# Altium PCB WGI_BOARD.PcbDoc (part 2 of 3)
Units mm, origin at the board's own origin, x right, y up, seen from the top; angles counter-clockwise.
Board outline 79.5 x 49.7 mm, 4 copper layers (Top Layer, Layer 1, Layer 2, Bottom Layer), stack 1.454 mm thick; 210 components, 179 nets, 665 pads, 228 vias.
Unrouted connection lines stored in the file: 133.
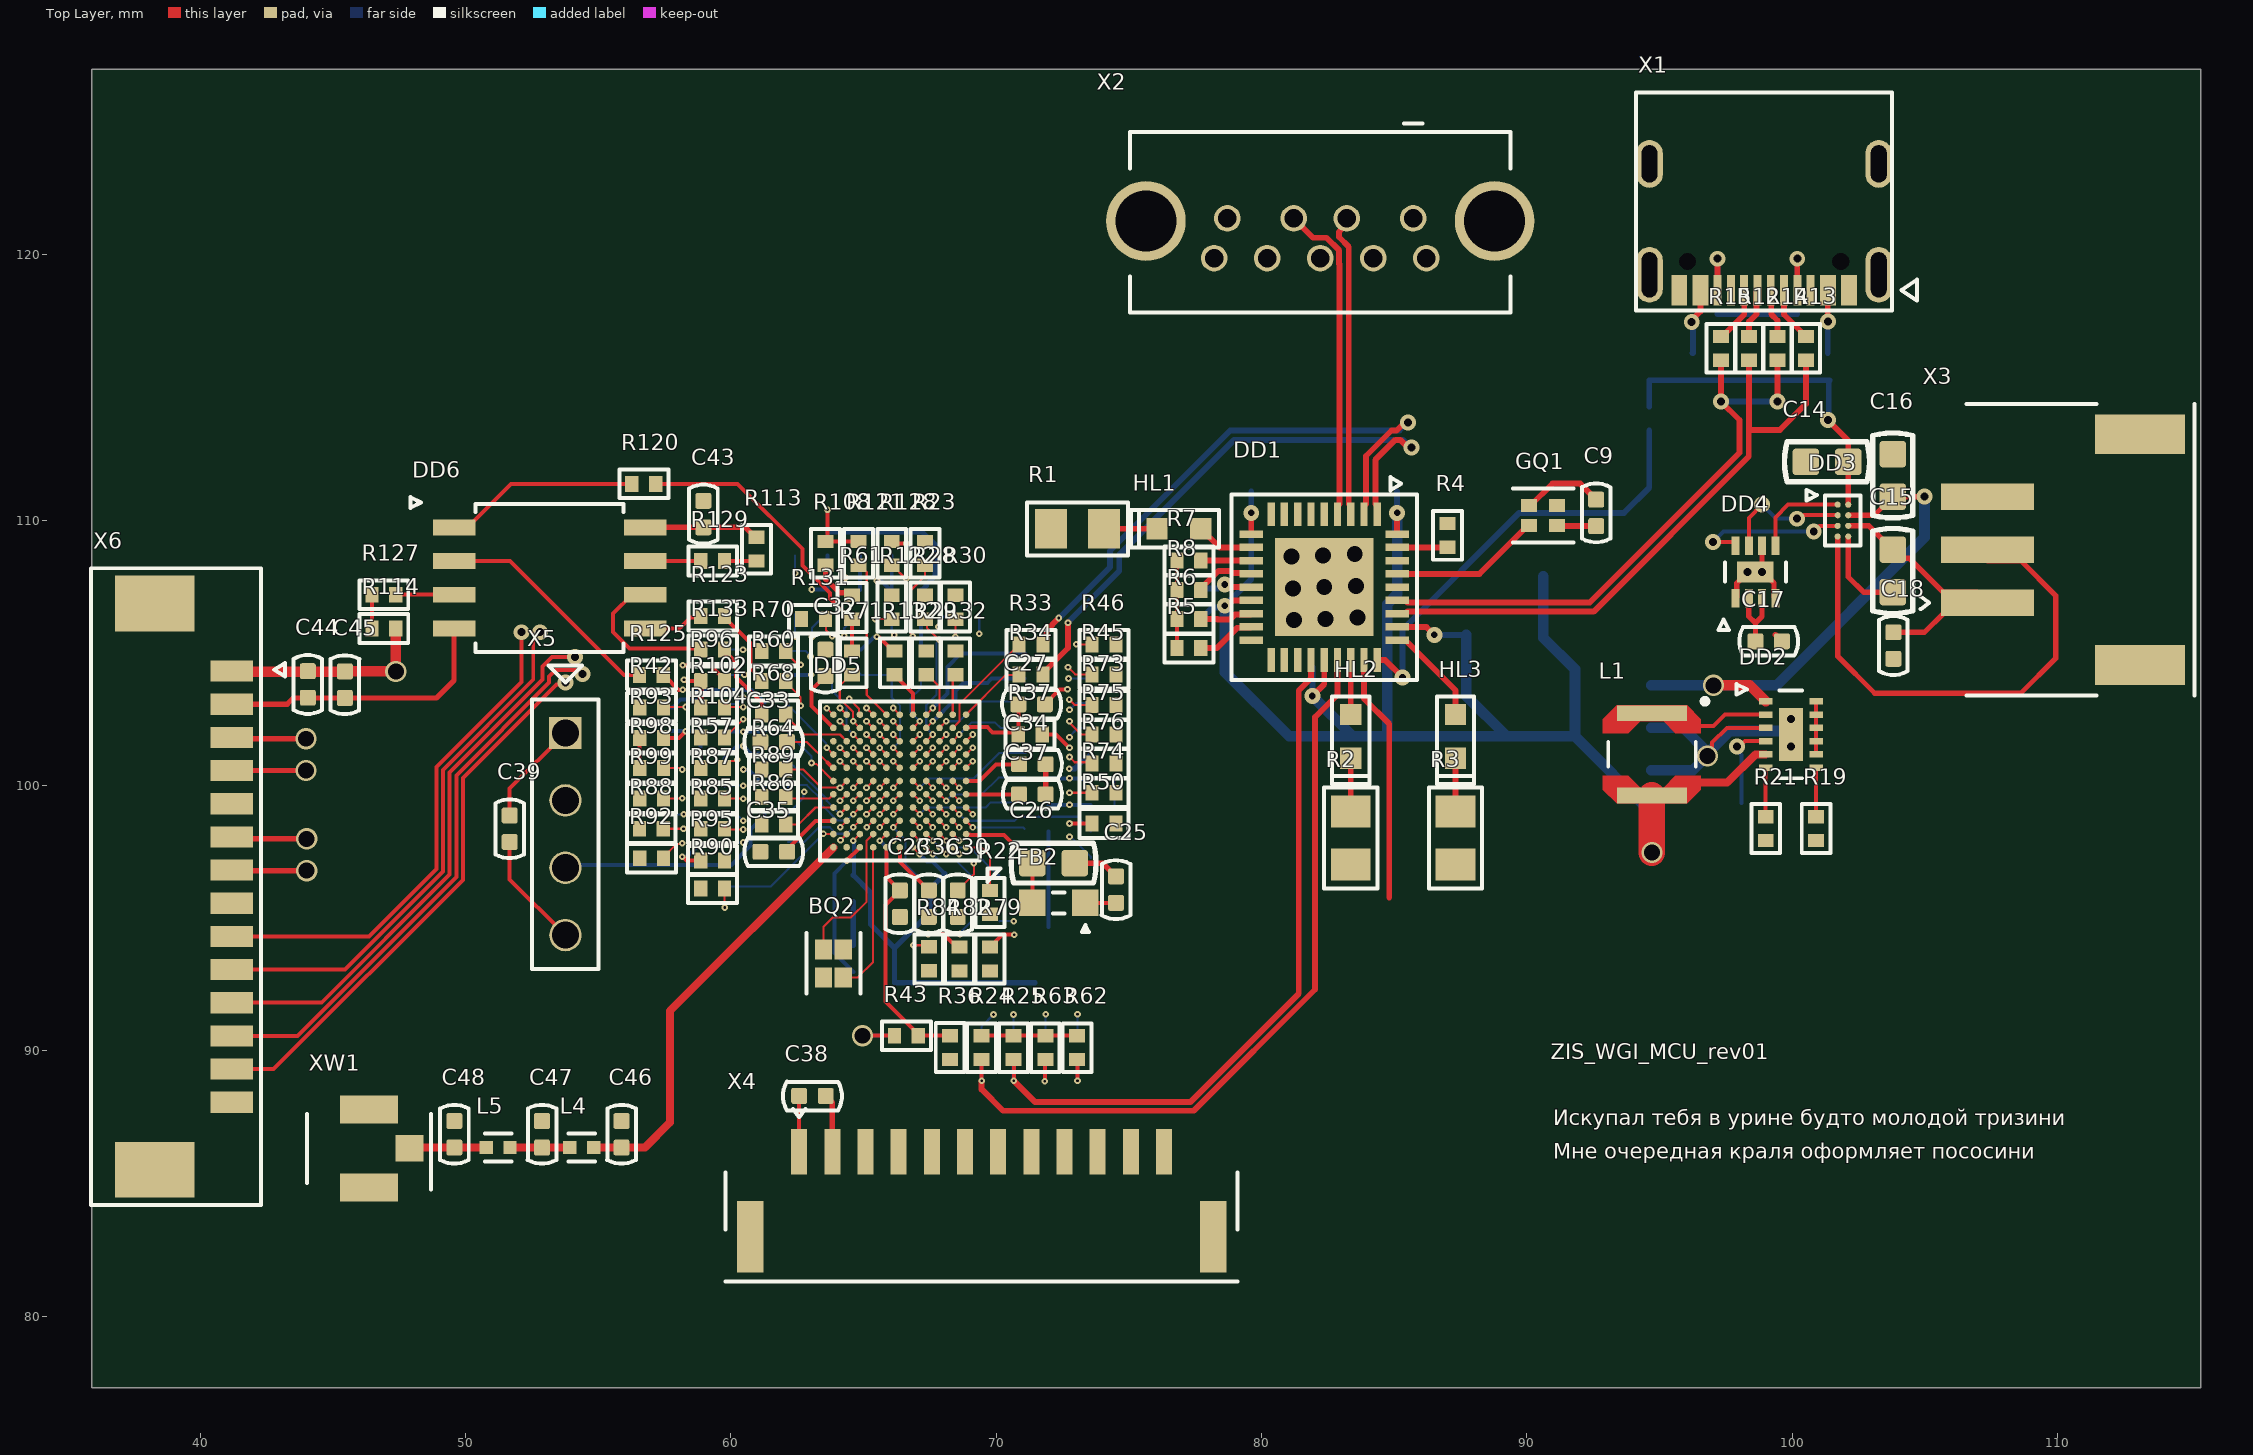
[diagram p0: Top Layer view]

## Via types
v1: diameter 0.25, hole 0.1, Top Layer to Bottom Layer, 179 vias
v2: diameter 0.6, hole 0.3, Top Layer to Bottom Layer, 24 vias
v3: diameter 0.8, hole 0.6, Top Layer to Bottom Layer, 18 vias
v4: diameter 0.6, hole 0.25, Top Layer to Bottom Layer, 7 vias

## Nets (pads, with @x,y where several pads share a name; then routed paths per layer and width w, separated by ;. In a path a pad name is that pad's centre, name@x,y a point inside that pad or via, vN(x,y) a via of type N, cw(c..) or ccw(c..) an arc to the next point about the centre after c; other vN are vias at no path point) (continued)
NetDD2_2: DD2.2 L1.1 | length 3.4
  Top Layer w0.15: 95.81,102.173 95.882,102.246 97.032,102.246 97.46,102.673 DD2.2@98.999,102.673
NetDD2_4: DD2.4 R20.1 | length 3.4
  Top Layer w0.15: v2(97.91,101.475) 98.025,101.475 98.223,101.673 DD2.4@98.999,101.673
  Bottom Layer w0.15: v2@97.885,101.475 97.885,101.354 98.085,101.154 R20.1@98.085,99.35
NetDD2_6: DD2.6 R21.1 | length 1.8
  Top Layer w0.15: R21.1@98.999,98.825 DD2.6@98.999,100.673
NetDD2_7: DD2.7 R19.1 | length 1.8
  Top Layer w0.15: R19.1@100.899,98.825 DD2.7@100.899,100.673